# Altium PCB PCB.PcbDoc
Units mm, origin at the board's own origin, x right, y up, seen from the top; angles counter-clockwise.
Board outline 9.25 x 9.25 mm, 2 copper layers (Top Layer, Bottom Layer); 6 components, 5 nets, 12 pads, 4 vias.
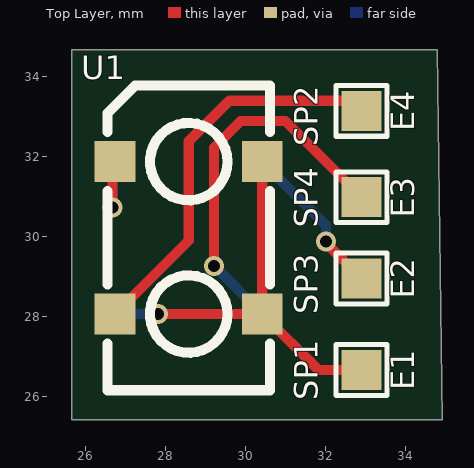
[diagram p0: Top Layer view]
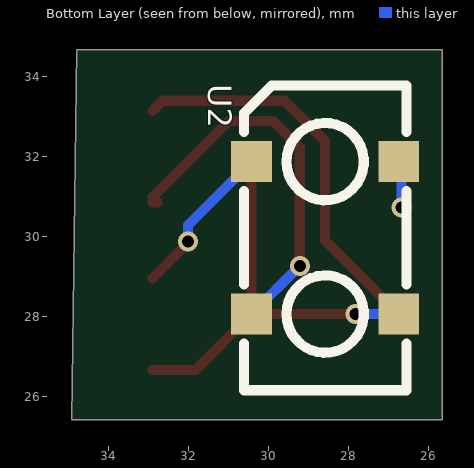
[diagram p1: Bottom Layer view, seen from below]

## Layer stack, top to bottom
Top Solder: solder mask 0.0102, Solder Resist, Dk 3.5
Top Layer: signal copper 0.0356
Dielectric 1: dielectric 0.32, FR-4, Dk 4.8
Bottom Layer: signal copper 0.0356
Bottom Solder: solder mask 0.0102, Solder Resist, Dk 3.5

## Board outline
25.654,25.425 25.654,34.671 34.786,34.671 34.907,25.425

## Design rules (kind name [scope] priority, off if disabled: settings)
Clearance [All] p1: gap=0.254 ignorepadtopadclearanceinfootprint=FALSE except(0: Arc-Hole Track-Hole SMDPad-Hole THPad-Hole Via-Hole Fill-Hole Poly-Hole Region-Hole Text-Hole)
MinimumSolderMaskSliver [All] p1: minsoldermaskwidth=0.12
PolygonConnect [All] p1: connectstyle=Relief reliefconductorwidth=0.254 reliefentries=4 polygonreliefangle="90 Angle" airgapwidth=0.254
RoutingVias [All] p1: holewidth=0.3 width=0.5 viastyle="Through Hole" minholewidth=0.3 minwidth=0.5 maxholewidth=0.3 maxwidth=0.5
SilkToSilkClearance [All] p1: silktosilkclearance=0.15
SilkToSolderMaskClearance [IsPad] p1: minsilkscreentomaskgap=0.05 clearancetoexposedcopper=TRUE
SolderMaskExpansion [All] p1: expansion=0.102
Width [All] p1: maxlimit=0.254 minlimit=0.254 preferedwidth=0.254
27 further rules are at their usual default settings.

## Components (designator, comment, footprint, x,y, rotation, side; value= is the part's Value field where it differs from the comment)
SP1 "E1" SP_1x1mm 32.893,26.67 r90 top
SP2 "E4" SP_1x1mm 32.893,33.147 r90 top
SP3 "E2" SP_1x1mm 32.893,28.956 r90 top
SP4 "E3" SP_1x1mm 32.893,30.988 r90 top
U1 "OPB733TR" OPTO-SMD_OPB733TR 28.575,29.972 r270 top
U2 "OPB733TR" OPTO-SMD_OPB733TR 28.575,29.972 r270 bottom

## Footprints (in the part's own frame and the unit in brackets; to place one, negate y for a bottom-side part, rotate by r counter-clockwise, add the part's x,y. Pads: shape width x height; smd on the part's side, far side on the other; paste and mask are expansions set on the pad)
OPTO-SMD_OPB733TR [mm]
  rect 1.02x1.02 smd paste+0 mask+0.05: 1(-1.905,-1.84) 2(1.905,-1.84) 3(1.905,1.84) 4(-1.905,1.84)
  silkscreen extent -3.81,-2.03 3.81,2.03, body extent -3.81,-2.35 3.81,2.35, height 3.25
SP_1x1mm [mm]
  rect 1x1 smd paste+0 mask+0.05: 1(0,0)
  silkscreen extent -0.64,-0.64 0.64,0.64

## Part data
SP1 SP2 SP3 SP4: library part SP_1X1, Manufacturer Part Number=NILL
U1 U2: Manufacturer Part Number=OPB733TR

## Via types
v1: diameter 0.5, hole 0.3, Top Layer to Bottom Layer, 4 vias

## Nets (pads, with @x,y where several pads share a name; then routed paths per layer and width w, separated by ;. In a path a pad name is that pad's centre, name@x,y a point inside that pad or via, vN(x,y) a via of type N, cw(c..) or ccw(c..) an arc to the next point about the centre after c; other vN are vias at no path point)
NetSP1_1: SP1.1 U1.3 U1.4 U2.3 | length 11.1
  Top Layer w0.254: v1(27.813,28.067) U1.3 ; U1.4 U1.3 ; SP1.1 31.812,26.67 U1.3
  Bottom Layer w0.254: U2.3@27.118,28.45 U2.3 v1(27.813,28.067)
NetSP2_1: SP2.1 U1.2 | length 9.9
  Top Layer w0.254: U1.2 28.575,29.907 28.575,32.385 29.591,33.401 32.639,33.401 SP2.1
NetSP3_1: SP3.1 U2.1 | length 3.9
  Top Layer w0.254: v1(32.004,29.877) 32.004,29.845 SP3.1
  Bottom Layer w0.254: U2.1 32.004,30.288 v1(32.004,29.877)
NetSP4_1: SP4.1 U2.2 | length 9.8
  Top Layer w0.254: v1(29.21,29.272) 29.21,32.231 29.872,32.893 30.988,32.893 SP4.1 SP4.1@32.829,30.924 ; SP4.1@32.829,30.924 32.893,30.861 32.766,30.861 SP4.1@32.829,30.924
  Bottom Layer w0.254: v1(29.21,29.272) U2.2
NetU1_1: U1.1 U2.4 | length 2.3
  Top Layer w0.254: v1(26.67,30.734) 26.67,31.812 U1.1
  Bottom Layer w0.254: v1(26.67,30.734) 26.67,31.812 U2.4

## Silkscreen, mask and mechanical layers (free items; w line width, h text height)
Top Overlay:
  text "E4" at 34.417,32.639 h1 r90
  text "E3" at 34.417,30.48 h1 r90
  text "E2" at 34.417,28.448 h1 r90
  text "E1" at 34.417,26.162 h1 r90
Mechanical 1:
  the board outline again, w0.2

## Dimensions
34.904,25.425 to 34.786,34.671 on Mechanical 2
25.654,25.425 to 34.904,25.425 on Mechanical 2